# Altium PCB Copy before routing of BetaBake..PcbDoc (part 4 of 4)
Units mil, origin at the board's own origin, x right, y up, seen from the top; angles counter-clockwise.
Board outline 6000 x 4000 mil, 8 copper layers (Top Layer, GND Plein, Signal 2, PWR, GND Plein 2, Signal 3, GND Plein 3, Bottom Layer), stack 40.468 mil thick; 436 components, 343 nets, 1746 pads, 14 vias.
Unrouted connection lines stored in the file: 1158.
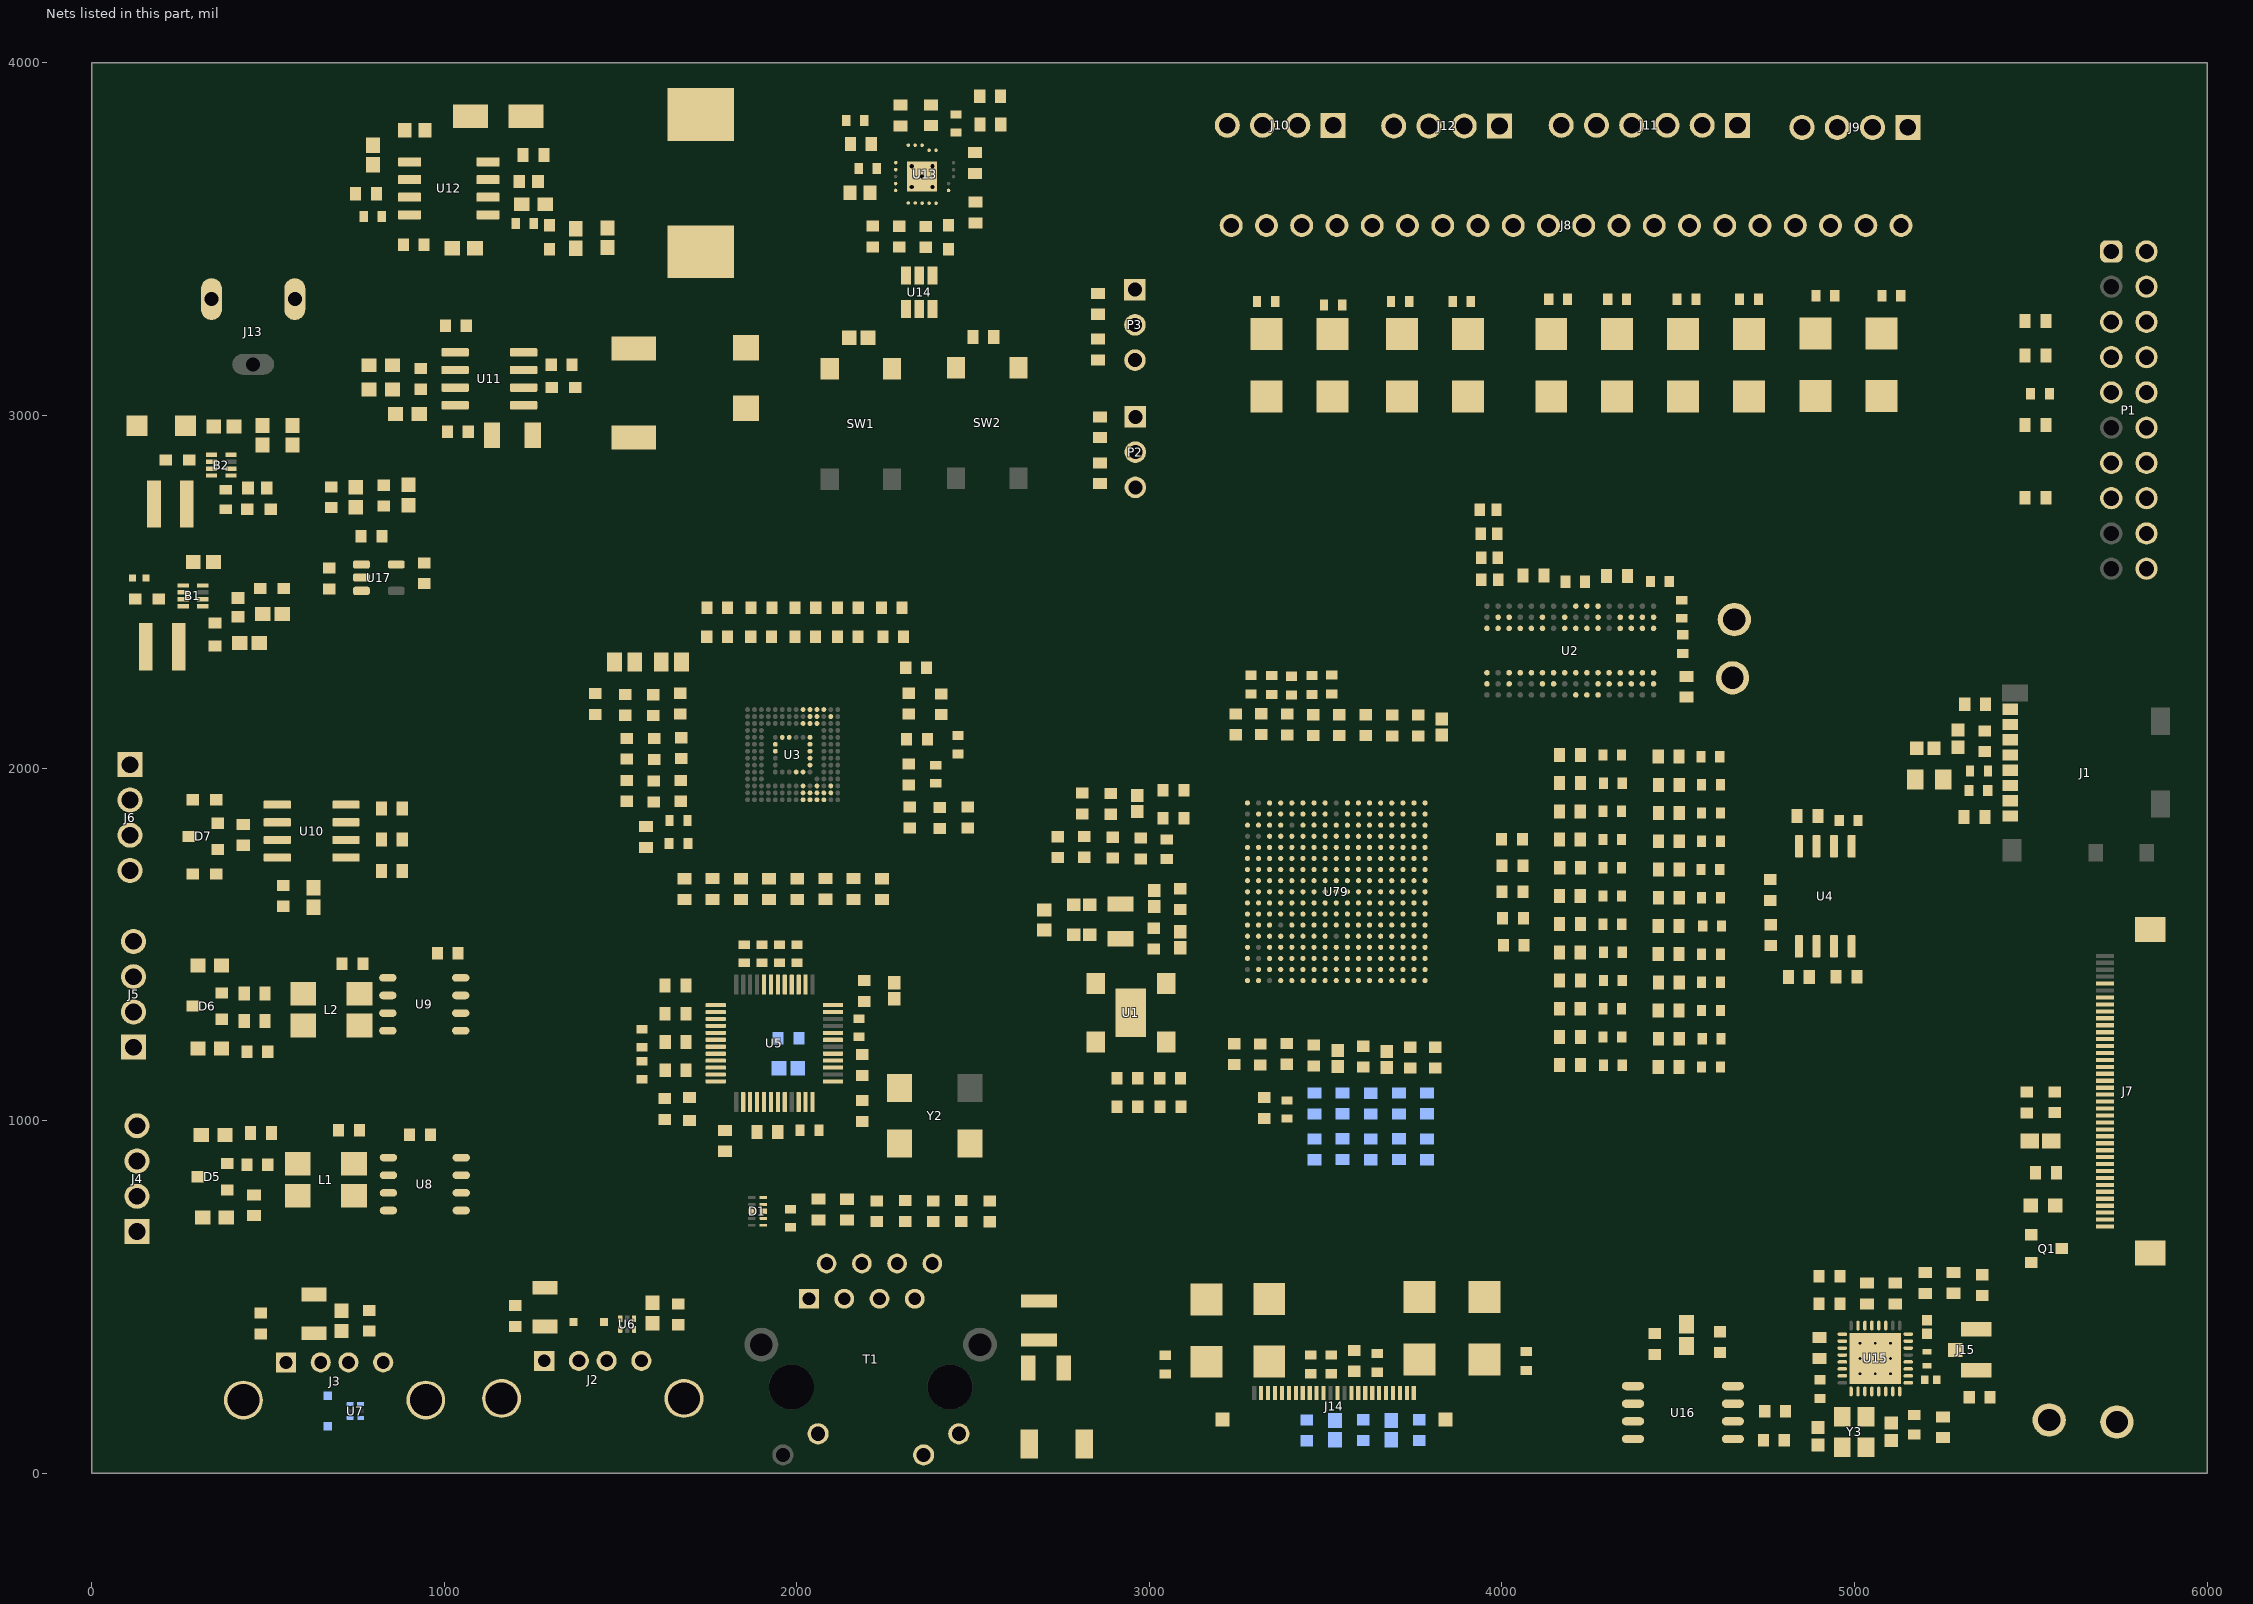
[diagram p5: the nets of this part, all layers, seen from the top]

## Part data (continued)
R143: library part CMP-2100-03664-2, "RES 10K OHM 1% 1/10W 0603", Case Code (Imperial)=0603, Case Code (Metric)=1608, Max Operating Temperature=155°C, Max Power Dissipation=100mW, Min Operating Temperature=-55°C, Resistance=10kR, Resistance Tolerance=1%, Resistor Type="Thick Film", Temperature Coefficient=100ppm/°C, Voltage Rating=75V, Voltage Rating (DC)=50V, Case/Package=0603, Construction=Rectangular, Depth=0.8mm, Features="Moisture Resistant", Height=0.45mm, Lead Free="Lead Free", Lead Pitch=0.3mm, Length=1.6mm, Military Standard=Not, Number of Pins=2, Number of Terminations=2, Packaging="Tape and Reel", Power Rating=100mW, RoHS Compliant=Yes, Series=RC, Size Code=0603, Termination=SMD/SMT, Tolerance=1%, Weight=7.1E-05oz, Width=0.8mm
R144: library part RC0603FR-07133KL, "133 kOhms Â±1% 0.1W, 1/10W Chip Resistor 0603 (1608 Metric) Moisture Resistant Thick Film", Package="1608 Yageo", Check_prices=https://www.snapeda.com/parts/RC0603FR-07133KL/Yageo/view-part/?ref=eda, MF=Yageo, MP=RC0603FR-07133KL, SnapEDA_Link=https://www.snapeda.com/parts/RC0603FR-07133KL/Yageo/view-part/?ref=snap
R145 R146 R153 R155: library part CMP-2100-03662-2, "RES SMD 100K OHM 1% 1/10W 0603", Case Code (Imperial)=0603, Case Code (Metric)=1608, Max Operating Temperature=155°C, Max Power Dissipation=100mW, Min Operating Temperature=-55°C, Resistance=100kR, Resistance Tolerance=1%, Resistor Type="Thick Film", Temperature Coefficient=100ppm/°C, Voltage Rating=50V, Working Voltage=75V, Case/Package=0603, Construction=Rectangular, Depth=0.8mm, Features="Moisture Resistant", Height=0.45mm, Lead Free="Lead Free", Length=1.6mm, Military Standard=Not, Number of Pins=2, Number of Terminations=2, Packaging="Tape and Reel", Power Rating=100mW, REACH SVHC="No SVHC", RoHS Compliant=Yes, Series=RC, Technology="THICK FILM", Termination=SMD/SMT, Tolerance=1%, Voltage Rating (DC)=50V, Width=0.8mm
R147 R159: library part CMP-2000-06925-2, "RES SMD 0 OHM JUMPER 1/10W 0603", Manufacturer=Yageo, Manufacturer Part Number=RC0603FR-070RL, Package=RC0603, Power Rating=0.1W, Temperature="-55°C to +155°C", Temperature Range High=+155°C, Temperature Range Low=-55°C, Tolerance=1%, Voltage Rating=75V, Automotive=No, Category=Res, ComponentLink2Description=Datasheet, ComponentLink2URL=http://www.yageo.com/documents/recent/PYu-RC_Group_51_RoHS_L_10.pdf, Composition="Thick Film", Device Class L1="Passive Components", Device Class L2=Resistors, Device Class L3="Chip SMD Resistors", Digikey Description="RES SMD 0 OHM JUMPER 1/10W 0603", Footprint Url=http://www.yageo.com/exep/pages/download/literatures/PYu-R_Mount_10.pdf, Height=0.55mm, Ipc Land Pattern Name=RESC16080X45, Lead Free=Yes, Mouser Description="RC Series 0603 0.1 W 0 O Jumper Surface Mount Thick Film Chip Resistor", Octopart=https://octopart.com/rc0603fr-070rl-yageo-1180803, Resistance=0Ω, RoHS=TRUE, Series=RC_L
R148: library part CMP-1659-00021-2, "Chip Resistor, 332 KOhm, +/- 1%, 0.1 W, -55 to 155 degC, 0603 (1608 Metric), RoHS, Tape and Reel", Case\Package=Metal, Colour=Silver, Package Quantity=300, Voltage Rating="40 V", ComponentLink1Description="Manufacturer URL", ComponentLink1URL=http://www.yageo.com/, ComponentLink2Description=Datasheet, ComponentLink2URL=http://www.yageo.com/documents/recent/PYu-RC_Group_51_RoHS_L_04.pdf, Connector Type=HDMI, Contact Material=Copper, Contact Plating=Gold, DatasheetVersion="Rev. 4, 02/2016", Gender=Female, Height="14.25 mm", Lead Pitch="0.5 mm", Length="15 mm", Mount="Surface Mount", PackageDescription="2-Pin Surface Mount Device, Body 1.6 x 0.8 mm", PackageReference=0603, Packaging="Tape and Reel", Pins=19, REACH SVHC="No SVHC", RoHSCompliant=true, Width="11.55 mm"
R149: library part CMP-2000-04894-1, Manufacturer=Yageo, Part Number=RC0603FR-07124KL
R150: library part CMP-2000-06926-1, "Chip Resistor, 10.2 KOhm, +/- 1%, 0.1 W, -55 to 155 degC, 0603 (1608 Metric), RoHS, Tape and Reel", Case Code - in=0603, Case Code - mm=1608, Manufacturer=Yageo, Operating Temperature Range=-55Cto+155C, Package / Case=0603(1608metric), Package Description="2-Pin Surface Mount Device, Body 1.6 x 0.8 mm", Power Rating=100mW, Resistance=10.2kOhms, Temperature Coefficient=100PPM/C, Tolerance=1%, Voltage Rating=75V, Brand=Yageo, Datasheet URL=http://www.yageo.com/documents/recent/PYu-RC_Group_51_RoHS_L_7.pdf, Datasheet Version="Rev. 7, 05/2017", Height=0.45mm, Length=1.6mm, Manufacturer URL=http://www.yageo.com/, Mounting Technology=SurfaceMount, Package Reference=0603, Packaging=Reel, Product=ThickFilmResistorsGeneralPurpose, Product Category=ThickFilmResistors, RoHS=True, Series=RC, Termination Style=SMD/SMT, Type=GeneralPurposeChipResistorSurfaceMount, Unit Weight=0.000071oz, Width=0.8mm
R151: library part CMP-2000-03299-2, "RES Thick Film, 3.24kΩ, 1%, 0.1W, 100ppm/°C, 0603", Case Code (Imperial)=0603, Case Code (Metric)=1608, Max Operating Temperature=155°C, Max Power Dissipation=100mW, Min Operating Temperature=-55°C, Package Quantity=10, Resistance=3.24kR, Temperature Coefficient=100ppm/°C, Tolerance=1%, Voltage Rating=75V, Case/Package=0603, Composition="Thick Film", Contact Plating=Tin, Depth=0.85mm, Features="Automotive AEC-Q200", Height=0.45mm, Length=1.55mm, Military Standard=Not, Mount="Surface Mount", Number of Pins=2, Number of Terminations=2, Packaging="Tape and Reel", Power Rating=100mW, Radiation Hardening=No, Termination=SMD/SMT, Weight=7.1E-05oz, Width=0.85mm, Working Voltage=75V
R152: library part CMP-2000-04112-1, Manufacturer=Yageo, Part Number=RC0603FR-0768K1L
R154: library part CMP-2000-03981-1, Manufacturer=Yageo, Part Number=RC0603FR-0729K4L
R160: library part CMP-2000-06944-1, "Chip Resistor, 68 KOhm, +/- 1%, 0.1 W, -55 to 155 degC, 0603 (1608 Metric), RoHS, Tape and Reel", Case Code - in=0603, Case Code - mm=1608, Manufacturer=Yageo, Operating Temperature Range=-55Cto+155C, Package Description="2-Pin Surface Mount Device, Body 1.6 x 0.8 mm", Power Rating=100mW, Resistance=68kOhms, Temperature Coefficient=100PPM/C, Tolerance=1%, Voltage Rating=50V, Datasheet URL=http://www.yageo.com/documents/recent/PYu-RC_Group_51_RoHS_L_7.pdf, Datasheet Version="Rev. 7, 05/2017", Manufacturer URL=http://www.yageo.com/, Mounting Technology=SurfaceMount, Package Reference=0603, Packaging=Reel, Product=ThickFilmResistorsGeneralPurpose, Series=RC, Termination Style=SMD/SMT
R161: library part CMP-2000-06938-1, "Chip Resistor, 33 KOhm, +/- 1%, 0.1 W, -55 to 155 degC, 0603 (1608 Metric), RoHS, Tape and Reel", Case Code - in=0603, Case Code - mm=1608, Manufacturer=Yageo, Operating Temperature Range=-55Cto+155C, Package Description="2-Pin Surface Mount Device, Body 1.6 x 0.8 mm", Power Rating=100mW, Resistance=33kOhms, Temperature Coefficient=100PPM/C, Tolerance=1%, Voltage Rating=50V, Datasheet URL=http://www.yageo.com/documents/recent/PYu-RC_Group_51_RoHS_L_7.pdf, Datasheet Version="Rev. 7, 05/2017", Manufacturer URL=http://www.yageo.com/, Mounting Technology=SurfaceMount, Package Reference=0603, Packaging=Reel, Product=ThickFilmResistorsGeneralPurpose, Series=RC, Termination Style=SMD/SMT
R162: library part CMP-2000-03962-1, Manufacturer=Yageo, Part Number=RC0603FR-0723K2L
R163: library part CMP-1012-00659-3, "Chip Resistor, 22 KOhm, +/- 1%, 0.1 W, -55 to 155 degC, 0603 (1608 Metric), RoHS, Tape and Reel", Case/Package=Radial, Current Rating="290 mA", Max Operating Temperature=105degC, Min Operating Temperature=-55degC, Package Quantity=100, Resistance="2.9 Ohm", Tolerance=10%, ComponentLink1Description="Manufacturer URL", ComponentLink1URL=http://www.yageo.com/, ComponentLink2Description=Datasheet, ComponentLink2URL=http://www.yageo.com/documents/recent/PYu-RC_Group_51_RoHS_L_04.pdf, DatasheetVersion="Rev. 4, 02/2016", Diameter="8.5 mm", Height="11 mm", Lead Pitch="5 mm", Mount="Through Hole", PackageDescription="2-Pin Surface Mount Device, Body 1.6 x 0.8 mm", PackageReference=0603, Packaging=Bulk, Pins=2, Radiation Hardening=No, REACH SVHC="No SVHC", RoHSCompliant=True, Shielding=Unshielded
R185: library part CMP-1659-00047-2, "Chip Resistor, 12 KOhm, +/- 1%, 100 mW, -55 to 155 degC, 0603 (1608 Metric), RoHS, Tape and Reel", Case Code (Imperial)=0603, Case Code (Metric)=1608, Max Operating Temperature="155 degC", Min Operating Temperature="-55 degC", Package Quantity=5000, Power Rating="100 mW", Resistance="12 kohm", Tolerance=1%, Voltage Rating="50 V", Case\Package=0603, ComponentLink1Description="Manufacturer URL", ComponentLink1URL=http://www.yageo.com/, ComponentLink2Description=Datasheet, ComponentLink2URL=http://www.yageo.com/documents/recent/PYu-RC_Group_51_RoHS_L_04.pdf, DatasheetVersion="Rev. 4, 02/2016", Height="0.45 mm", Length="1.6 mm", Mount="Surface Mount", PackageDescription="2-Pin Surface Mount Device, Body 1.6 x 0.8 mm", PackageReference=0603, Packaging="Tape and Reel", Pins=2, REACH SVHC="No SVHC", RoHSCompliant=true, Voltage Rating (DC)="50 V", Width="0.8 mm"
SW1 SW2: library part CMP-2000-05160-3, "Switch Tactile N.O SPST Round Button Gull Wing 0.05A 12VDC 100000Cycle 1.57N SMD T/R", Case/Package=SMD/SMT, Color=Black, Contact Current Rating=50mA, Contact Resistance=100mΩ, Insulation Resistance=100GΩ, Manufacturer Package Identifier=PTS645SM43SMTR92LFS, Max Operating Temperature=60°C, Max Voltage Rating (DC)=12V, Min Operating Temperature=-20°C, Operating Force=1.57N, Actuator Length=850µm, Actuator Material="Nylon, Polyamide", China RoHS=Compliant, ComponentLink1Description="Manufacturer's Website", ComponentLink1URL=http://www.ck-components.com/, ComponentLink2Description="Datasheet URL", ComponentLink2URL=https://www.ckswitches.com/media/1471/pts645.pdf, Contact Material=Silver, Contact Plating=Silver, Current Rating=50mA, Depth=9mm, Electrical Life=100kcycles, Height=3.45mm, HelpURL=https://www.ckswitches.com/media/1471/pts645.pdf, Illumination Type="Illuminated, Non-Illuminated", Lead Free="Lead Free", Length=6mm, Life (Cycles)=100kcycles, Lifecycle Status=Production, Max Current Rating=50mA, Mechanical Life=100kcycles, Mount="Surface Mount", Number of Positions=1, Orientation=Straight, Packaging="Cut Tape (CT)", REACH SVHC=Yes, RoHS=Compliant, Switch Function=Off-Mom, Termination=Solder, Throw Configuration=SPST, Voltage Rating (DC)=12V
T1: "RJ45 CONN, JACK, 8P8C, 1PORT, SMT ROHS COMPLIANT: YES", Package=None, Check_prices=https://www.snapeda.com/parts/7498010210A/W%25C3%25BCrth+Elektronik+Midcom/view-part/?ref=eda, MF="WÃ¼rth Elektronik", MP=7498010210A, SnapEDA_Link=https://www.snapeda.com/parts/7498010210A/W%25C3%25BCrth+Elektronik+Midcom/view-part/?ref=snap
U1: library part ASVMB-24.000MHZ-LY-T, "No Description Available", Manufacturer_Name=Abracon, Copyright="Copyright (C) 2026 Ultra Librarian. All rights reserved.", Manufacturer_Part_Number=ASVMB-24.000MHZ-LY-T, RefDes=RefDes, Type=Type
U2: library part CMP-2000-07475-2, "IC DRAM 4G PARALLEL 96FBGA", Manufacturer=Micron, Max Supply Voltage=1.45V, Min Supply Voltage=1.283V, Nominal Supply Current=12-156mA, Package=TW, Temperature="0°C to +85°C", Temperature Range High=+85°C, Temperature Range Low=0°C, Access Time=1.07ns, Automotive=No, Category=IC, ComponentLink2Description=Datasheet, ComponentLink2URL=https://www.micron.com/-/media/client/global/documents/products/data-sheet/dram/ddr3/4gb_ddr3l.pdf, Device Class L1="Integrated Circuits (ICs)", Device Class L2=Memory, Device Class L3=RAM, Digikey Description="IC DRAM 4G PARALLEL 96FBGA", Height=1.2mm, Interface=Parallel, Lead Free=Yes, Manufacturer Part Number=MT41K256M16TW-107:P, Memory Size=4Gbits, Memory Type=SDRAM,DDR3, Octopart=https://octopart.com/mt41k256m16tw-107%3Ap-micron-66533852, RoHS=TRUE, Standoff Height=0.29mm
U3: "4GB e.MMC Flash v5.1 Vcc 2.7 V - 3.6 V (13 x 11.5 x 0.8mm) I-Temp - FBGA-153", Package=None, Check_prices=https://www.snapeda.com/parts/S40FC004C1B1I00000/SkyHigh+Memory/view-part/?ref=eda, MF="SkyHigh Memory", MP=S40FC004C1B1I00000, SnapEDA_Link=https://www.snapeda.com/parts/S40FC004C1B1I00000/SkyHigh+Memory/view-part/?ref=snap
U4: "FLASH - NOR Memory IC 128Mb (16M x 8) SPI - Quad I/O, QPI, DTR 133 MHz 8-SOIC", Package="SOIC-8 Winbond Electronics", Check_prices=https://www.snapeda.com/parts/W25Q128JVSIQ/Winbond/view-part/?ref=eda, MF="Winbond Electronics", MP=W25Q128JVSIQ, SnapEDA_Link=https://www.snapeda.com/parts/W25Q128JVSIQ/Winbond/view-part/?ref=snap
U5: library part CMP-0058-00752-4, "PHYTER® Industrial Temperature Single Port 10/100 Mb/s Ethernet Physical Layer Transceiver, 48-pin LQFP, Pb-Free, 250 Tray", Manufacturer="Texas Instruments", PackageTopMarking=NSUZXYTT*DP83848VV*VBI, PowerWise=N, ComponentLink1Description="Datasheet URL", ComponentLink1URL=http://www.ti.com/general/docs/lit/getliterature.tsp?genericPartNumber=DP83848I&fileType=pdf, CompType="Interface IC", High-Reliability=Y, PackageDescription="LQFP, 7 x 7 x 1.4mm, 48 Lead, 0.5mm Pitch", PackageReference=PT0048A, PartNumber=DP83848IVV/NOPB, PinCount=48, RoHS=Y
U6 U7: library part CMP-0326-00025-3, "Low-Capacitance + / - 15 kV ESD-Protection Array for High-Speed Data Interfaces, 2 Channels, -40 to +85 degC, 6-pin SON (DRY), Green (RoHS & no Sb/Br)", Breakdown Voltage(Min)(V)=11, IO Capacitance(Typ)(pF)=1.5, IO Leakage Current(nA)=1, Manufacturer="Texas Instruments", ComponentLink1Description="Manufacturer URL", ComponentLink1URL=http://www.ti.com/, ComponentLink2Description=Datasheet, ComponentLink2URL=http://www.ti.com/general/docs/lit/getliterature.tsp?genericPartNumber=TPD2E001&fileType=pdf, ComponentLink3Description="URL Link1", ComponentLink3URL=SamplesURL:http://www.ti.com/product/tpd2e001#samples, DatasheetVersion=SLLS684F, Eco-Plan="Green (RoHS & no Sb/Br)", IEC 61000-4-2 Air-Gap(+/- kV)=15, IEC 61000-4-2 Contact(+/- kV)=8, Mounting Technology="Surface Mount", PackageDescription="6-Pin Plastic Small Outline No-Lead, 1 x 1.45 x 0.6 mm Body, 0.5 mm Pitch", PackageReference=DRY0006A, PackageVersion="revF, Dec-2011", PartNumber=TPD2E001DRYR, SubFamily="ESD Solution", USB High Speed=TRUE
U8 U9: library part CMP-2000-07245-1, "High-Speed CAN Transceiver, 3 to 5 V, 8-Pin SOIC (SOT96-1), RoHS, Tape and Reel", Manufacturer=NXP, Operating Supply Voltage (Max)=5.5V, Operating Supply Voltage (Min)=4.5V, Operating Supply Voltage (Typ)=5V, Operating Temperature (Max)=125C, Operating Temperature (Min)=-40C, Operating Temperature Classification=Automotive, Package Description="8-Pin Small Outline Integrated Circuit, Body 4.9 x 3.9 mm, Pitch 1.27 mm", Package Reference=SOT96-1, Package Type=SO, Power Down Mode=Normal/Silent, Supply Current=70mA, Category=Transceiver, Data Rate=1Mbps, Datasheet URL=http://www.nxp.com/documents/data_sheet/TJA1051.pdf, Datasheet Version="Rev. 7, 01/2015", DELETED=Compliant, Manufacturer URL=http://www.nxp.com/, Mounting=SurfaceMount, Mounting Technology=SurfaceMount, Number of Transceivers=1, Packaging=TapeandReel, Pin Count=8, Rad Hardened=No, Standard Supported=ISO11898-2
U10: "3.3V Powered, Â±15kV ESD-Protected, 12Mbps, Slew-Rate-Limited True RS-485/RS-422 Transceivers3.3V ä¾›ç”µã€Â±15kV ESD ä¿æŠ¤ã€12Mbpsã€åŽ‹æ‘†çŽ‡å—é™çš„çœŸæ­£ RS-485/RS-422 æ”¶å‘å™¨", Package="SOIC-8 Maxim", Check_prices=https://www.snapeda.com/parts/MAX3485EESA+T/Analog+Devices/view-part/?ref=eda, MF="Analog Devices", MP=MAX3485EESA+T, SnapEDA_Link=https://www.snapeda.com/parts/MAX3485EESA+T/Analog+Devices/view-part/?ref=snap
U11: "6.5V to 28V Input, 5V Fixed Output at 2A Step-Down Regulator with Intregrated MosFET", Package="SOIC-8 Texas Instruments", Check_prices=https://www.snapeda.com/parts/TPS5405DR/Texas+Instruments/view-part/?ref=eda, MF="Texas Instruments", MP=TPS5405DR, SnapEDA_Link=https://www.snapeda.com/parts/TPS5405DR/Texas+Instruments/view-part/?ref=snap
U12: library part CMP-0323-00209-3, "Buck Step Down Regulator with 3.5 to 28 V Input and 0.8 to 25 V Output, -40 to 150 degC, 8-Pin SOIC (D), Green (RoHS & no Sb/Br)", Manufacturer="Texas Instruments", Rating=Catalog, Switch Current Limit(Typ)(A)=3.5, Code_JEDEC=MS-012AA, ComponentLink1Description=Datasheet, ComponentLink1URL=http://www.ti.com/general/docs/lit/getliterature.tsp?genericPartNumber=TPS54331&fileType=pdf, ComponentLink2Description="Package Specification", ComponentLink2URL=http://www.ti.com/litv/pdf/msoi002j, ComponentLink3Description="URL Link1", ComponentLink3URL="Samples URL:http://www.ti.com/product/tps54331#samples", DatasheetVersion=SLVS839D, Duty Cycle(Max)(%)=90, Eco-Plan="Green (RoHS & no Sb/Br)", Iout(Max)(A)=3, Iq(Typ)(mA)=0.11, Mounting Technology="Surface Mount", PackageDescription="8-Pin Plastic Small Outline Integrated Circuit, 4.9 x 3.9 mm, Pitch 1.27 mm Pitch", PackageReference=D0008A, PackageVersion="revM, Jun-2011", PartNumber=TPS54331DR, Regulated Outputs(#)=1, SubFamily="Step-Down Regulator", Topology=Buck, Vin(Max)(V)=28, Vin(Min)(V)=3.5, Vout(Max)(V)=25, Vout(Min)(V)=0.8
U13: library part CMP-04919-000038-1, "IC SUPERVISOR 4 CHANNEL 20QFN", Case/Package=QFN, Max Operating Temperature=125°C, Max Output Current=1mA, Max Power Dissipation=2.86W, Max Reset Threshold Voltage=404mV, Max Supply Voltage=6.5V, Min Operating Temperature=-40°C, Min Reset Threshold Voltage=396mV, Min Supply Voltage=1.8V, Nominal Supply Current=13uA, Number of Voltages Monitored=4, Overvoltage Threshold=400mV, Package Quantity=1, Quiescent Current=12uA, Accuracy=0.25%, Height=0.95mm, Lead Free="Lead Free", Length=4.15mm, Mount="Surface Mount", Number of Pins=20, Operating Supply Current=13uA, Packaging="Tape and Reel", Power Dissipation=2.86W, Radiation Hardening=No, REACH SVHC="No SVHC", Reset="Active Low", RoHS Compliant=Yes, Termination=SMD/SMT, Threshold Voltage=400mV, Type="Multi-Voltage Supervisor", Watchdog Timer=Yes, Width=4.15mm
U14: library part CMP-0332-00499-1, "Low Quiescent Current, Programmable-Delay Supervisory Circuit, 1 Supply Monitored, -40 to 125 degC, 6-pin SOT-23 (DBV), Green (RoHS & no Sb/Br)", Manufacturer="Texas Instruments", PartNumber=TPS3808G33DBVTG4, Rating=Catalog, Threshold Voltage 1 (typ)(Typ)(V)=3.07, # of supplies monitored=1, Code_JEDEC=MO-178-AB*, ComponentLink1Description=Datasheet, ComponentLink1URL=http://www.ti.com/general/docs/lit/getliterature.tsp?genericPartNumber=TPS3808G33&fileType=pdf, DatasheetVersion=SBVS050J, Iq(Typ)(uA)=2.4, Mounting Technology="Surface Mount", Output Driver Type / Reset Output="Active-low, Open-drain", PackageDescription="6-Pin Plastic Small-Outline Package, 2.9 x 1.6 mm Body, 0.95 mm Pitch, 2.8 mm Lead Span", PackageReference=DBV6, PackageVersion="revK, Mar-2006", Reset Threshold Accuracy(%)=0.5, SubFamily="Supervisor and Reset IC", Time Delay(ms)=Programmable, VCC(Max)(V)=6.5, VCC(Min)(V)=1.7
U15: library part CMP-2000-07453-1, "Low-Power, Highly-Integrated Wi-Fi Solution, 2.5 to 3.6 V, 80 mA, -40 to 125 degC, 32-Pin QFN", Manufacturer="Espressif Systems", Package Description="32-Pin Quad Falt No-Lead, Body 5 x 5 mm, Pitch 0.5 mm", Package Reference=QFN-32, Datasheet URL=http://espressif.com/sites/default/files/documentation/0a-esp8266ex_datasheet_en.pdf, Datasheet Version="Rev. 5.4, 04/2017", Manufacturer URL=http://espressif.com, Mounting Technology=SurfaceMount
U16: library part W25Q32JVSSIQ, "FLASH - NOR Memory IC 32Mb (4M x 8) SPI - Quad I/O 133 MHz 8-SOIC", Package="SOIC-8 Winbond", Check_prices=https://www.snapeda.com/parts/W25Q32JVSSIQ/Winbond+Electronics/view-part/?ref=eda, MF=Winbond, MP=W25Q32JVSSIQ, SnapEDA_Link=https://www.snapeda.com/parts/W25Q32JVSSIQ/Winbond+Electronics/view-part/?ref=snap
U17: "300-mA, high-PSRR, low-IQ, low-dropout voltage regulator with enable", Package="SOT-23-5 Texas Instruments", Check_prices=https://www.snapeda.com/parts/TLV70218DBVT/Texas+Instruments/view-part/?ref=eda, MF="Texas Instruments", MP=TLV70218DBVT, SnapEDA_Link=https://www.snapeda.com/parts/TLV70218DBVT/Texas+Instruments/view-part/?ref=snap
Y1: library part ECS-.327-6-34RR-TR, "32.768kHz 20ppm Crystal 6pF 20 kOhm -40C ~ 85C Surface Mount 2-SMD, No Lead 3.2 x 1.5", Package="ECX-34RR-34RR-2 ECS", Check_prices=https://www.snapeda.com/parts/ECS-.327-6-34RR-TR/ECS/view-part/?ref=eda, MF="ECS Inc.", MP=ECS-.327-6-34RR-TR, SnapEDA_Link=https://www.snapeda.com/parts/ECS-.327-6-34RR-TR/ECS/view-part/?ref=snap
Y3: library part CMP-27762-015775-1, "Crystal 26MHz ±20ppm (Tol) ±30ppm (Stability) 18pF FUND 60Ω 4-Pin SMD T/R", Case/Package=CSMD, ESR (Equivalent Series Resistance)=60R, Frequency=26MHz, Frequency Stability=30ppm, Frequency Tolerance=20ppm, Load Capacitance=18pF, Max Operating Temperature=85°C, Min Operating Temperature=-40°C, Operating Frequency="26 MHz", Package Quantity=1000, Depth=2.5mm, Height=1mm, Lead Free="Lead Free", Length=3.2mm, Mount="Surface Mount", Packaging="Tape and Reel", Series=ABM8G, Termination=SMD/SMT, Tolerance=20ppm, Width=2.5mm

## Via types
v1: diameter 19.68, hole 7.87, Top Layer to Bottom Layer, 9 vias
v2: diameter 23.62, hole 11.81, Top Layer to Bottom Layer, 5 vias

## Nets (pads, with @x,y where several pads share a name; then routed paths per layer and width w, separated by ;. In a path a pad name is that pad's centre, name@x,y a point inside that pad or via, vN(x,y) a via of type N, cw(c..) or ccw(c..) an arc to the next point about the centre after c; other vN are vias at no path point)
A: D7.2 J6.1 R95.2 R100.1 U10.6
AGND: B1.4 B2.4 C151.1 C160.1 C161.2 J14.2 R145.1 R153.1 U5.15 U5.19
AVDD: C87.1 C90.2 C92.2 C93.2 C99.2 C151.2 C160.2 C161.1 C168.2 FB6.2 J14.4 R79.1 R80.1 R83.2 R84.2 R87.2 R88.2 T1.5 T1.6 U5.22 U15.1 U15.30
B: D7.1 J6.2 R95.1 R98.1 U10.7
"Chassis GND": C88.2 D2.2 R73.2 T1.10
CSI_DATA0: J14.24 U79.E4
CSI_DATA1: J14.23 U79.E3
CSI_DATA2: J14.22 U79.E2
CSI_DATA3: J14.21 U79.E1
CSI_DATA4: J14.20 U79.D4
CSI_DATA5: J14.19 U79.D3
CSI_DATA6: J14.18 U79.D2
CSI_DATA7: J14.16 U79.D1
DRAM_1V35: C7.1 C8.1 C9.1 C10.1 C11.1 C12.1 C13.1 C132.2 C133.2 C137.2 C148.2 C149.1 D21.2 L6.2 R149.2 R155.2 R163.1 R168.2 U79.G6 U79.H6 U79.J6 U79.K6 U79.L6 U79.M6
DRAM_ADDR0: U2.N3 U79.L5
DRAM_ADDR1: U2.P7 U79.H2
DRAM_ADDR2: U2.P3 U79.K1
DRAM_ADDR3: U2.N2 U79.M2
DRAM_ADDR4: U2.P8 U79.K4
DRAM_ADDR5: U2.P2 U79.L1
DRAM_ADDR6: U2.R8 U79.G2
DRAM_ADDR7: U2.R2 U79.H4
DRAM_ADDR8: U2.T8 U79.J4
DRAM_ADDR9: U2.R3 U79.L2
DRAM_ADDR10: U2.L7 U79.M4
DRAM_ADDR11: U2.R7 U79.K3
DRAM_ADDR12: U2.N7 U79.L4
DRAM_ADDR13: U2.T3 U79.H3
DRAM_ADDR14: U2.T7 U79.G1
DRAM_ADDR15: U2.J1 U79.K5
DRAM_DATA0: U2.E3 U79.T4
DRAM_DATA1: U2.F7 U79.U6
DRAM_DATA2: U2.F2 U79.T6
DRAM_DATA3: U2.F8 U79.U7
DRAM_DATA4: U2.H3 U79.U8
DRAM_DATA5: U2.H8 U79.T8
DRAM_DATA6: U2.G2 U79.T5
DRAM_DATA7: U2.H7 U79.U4
DRAM_DATA8: U2.D7 U79.U2
DRAM_DATA9: U2.C3 U79.U3
DRAM_DATA10: U2.C8 U79.U5
DRAM_DATA11: U2.C2 U79.R4
DRAM_DATA12: U2.A7 U79.P5
DRAM_DATA13: U2.A2 U79.P3
DRAM_DATA14: U2.B8 U79.R2
DRAM_DATA15: U2.A3 U79.R1
DRAM_SDQ0_N: C46.2 C47.2 U2.G3 U79.P7
DRAM_SDQ0_P: C46.1 C47.1 U2.F3 U79.P6
DRAM_SDQS1_N: C48.2 C49.2 U2.B7 U79.T2
DRAM_SDQS1_P: C48.1 C49.1 U2.C7 U79.T1
DRAM_VREF: C45.1 C148.1 C150.2 R168.1 R169.2 U79.P4
EMMC_DATA0: R62.2 U3.A3 U79.D7
EMMC_DATA1: R61.2 U3.A4 U79.B7
EMMC_DATA2: R60.2 U3.A5 U79.A7
EMMC_DATA3: R59.2 U3.B2 U79.D6
EMMC_DATA4: R58.2 U3.B3 U79.C6
EMMC_DATA5: R57.2 U3.B4 U79.B6
EMMC_DATA6: R56.2 U3.B5 U79.A6
EMMC_DATA7: R55.2 U3.B6 U79.A5
GND: C1.2 C2.2 C3.2 C4.2 C5.2 C6.2 C7.2 C8.2 C9.2 C10.2 C11.2 C12.2 C13.2 C14.2 C15.2 C16.2 C17.2 C18.2 C19.2 C20.2 C21.2 C22.2 C23.2 C24.2 C25.2 C26.2 C27.2 C28.2 C29.2 C30.1 C31.1 C32.2 C33.2 C34.2 C35.2 C36.1 C37.2 C38.2 C39.2 C40.2 C41.2 C42.2 C43.2 C44.1 C45.2 C50.1 C51.1 C52.1 C53.2 C54.2 C55.2 C56.2 C57.2 C58.2 C59.2 C60.2 C81.2 C82.2 C83.2 C87.2 C88.1 C90.1 C91.1 C92.1 C93.1 C94.2 C95.2 C96.2 C97.2 C98.1 C99.1 C100.1 C101.2 C102.1 C103.2 C104.1 C105.2 C106.1 C107.2 C108.1 C109.1 C110.2 C111.1 C112.2 C113.1 C114.1 C115.1 C116.2 C117.1 C120.2 C121.1 C124.1 C128.1 C130.1 C131.1 C134.2 C135.2 C136.2 C139.2 C140.2 C142.2 C144.2 C145.1 C146.2 C147.1 C149.2 C150.1 C152.1 C153.1 C154.1 C155.1 C159.1 C162.1 C163.1 C164.1 C165.1 C166.1 C167.1 C168.1 C169.1 C170.1 C245.2 C356.1 D1.3 D1.8 D2.1 D3.1 D4.1 D5.3 D6.3 D7.3 D8.1 D9.1 D10.1 D11.1 D12.1 D13.1 D14.1 D15.1 D16.1 D17.1 D18.2 D20.2 D22.1 D23.1 D24.1 D25.1 GND.1 J1.6 J2.4 J2.5 J2.6 J3.4 J3.5 J3.6 J4.3 J4.4 J5.3 J5.4 J6.3 J6.4 J7.3 J7.29 J7.36 J7.41 J7.42 J8.4 J8.10 J8.14 J8.18 J8.19 J8.20 J9.4 J10.4 J11.6 J12.4 J13.2 J14.15 J14.MP1 J14.MP2 J15.G1 J15.G2 P1.4 P1.6 P1.8 P1.10 P1.12 P1.14 P1.16 P1.18 P1.20 Q1.2 R6.1 R7.1 R8.1 R9.1 R10.1 R11.1 R12.1 R13.1 R14.1 R15.1 R16.1 R17.1 R18.1 R19.1 R20.1 R21.1 R22.1 R23.1 R24.1 R25.1 R26.1 R27.1 R28.1 R29.1 R30.1 R31.1 R32.1 R33.1 R34.1 R35.1 R36.1 R37.1 R38.1 R39.1 R40.2 R43.2 R44.2 R45.1 R46.1 R65.1 R73.1 R76.2 R78.1 R81.1 R86.2 R96.1 R98.2 R135.2 R142.2 R151.2 R152.1 R154.1 R164.1 R165.1 R166.1 R167.1 R169.1 R171.1 R173.1 R184.2 R185.2 SW1.3 SW2.3 U1.2 U1.5 U3.A6 U3.C4 U3.E7 U3.G5 U3.H10 U3.J5 U3.K8 U3.N2 U3.N5 U3.P4 U3.P6 U4.4 U5.35 U5.36 U5.47 U6.4 U7.4 U8.2 U8.8 U9.2 U9.8 U10.5 U11.7 U12.7 U13.6 U13.11 U13.12 U13.21 U14.2 U15.33 U16.4 U17.2 U79.A1 U79.A17 U79.C3 U79.C7 U79.C11 U79.C15 U79.E8 U79.E11 U79.F6 U79.F7 U79.F8 U79.F9 U79.F10 U79.F11 U79.F12 U79.G3 U79.G5 U79.G7 U79.G12 U79.G15 U79.H7 U79.H12 U79.J5 U79.J7 U79.J12 U79.K7 U79.K12 U79.L3 U79.L7 U79.L12 U79.M7 U79.M8 U79.M9 U79.M10 U79.M11 U79.M12 U79.N3 U79.N5 U79.N7 U79.R3 U79.R5 U79.R7 U79.R11 U79.R16 U79.R17 U79.T14 U79.U1 U79.U14 U79.U17 Y2.2 Y3.2 Y3.4
  other v1: 5015.69,282 5059,282 5102.31,282 5015.69,325.31 5059,325.31 5102.31,325.31 5015.69,368.61 5059,368.61 5102.31,368.61
  other v2: 2325.94,3648 2385,3648 2355.47,3677.53 2325.94,3707.06 2385,3707.06
I2C1_SCL: D13.2 J8.12 J12.2 R2.1 U79.F17
I2C1_SDA: D12.2 J8.13 J12.3 R1.1 U79.G13
I2C2_SCL: D9.2 J8.16 J10.2 R3.1 R174.2 U79.G17
I2C2_SDA: D8.2 J8.17 J10.3 J14.3 R4.1 U79.G16
LED_ACT/COL: T1.2 U5.26
LED_LINK: T1.11 U5.28
LED_SPEED: R71.1 U5.27
MODE_RS485: R96.2 U10.2 U10.3
NetB1_3: B1.3 D19.1 R146.1
NetB1_5: B1.5 L3.1
NetB1_6: B1.6 C125.1 R144.1 R145.2
NetB2_3: B2.3 D21.1 R155.1
NetB2_5: B2.5 L6.1
NetB2_6: B2.6 C137.1 R149.1 R153.2
NetC18_1: C18.1 C19.1 C20.1 C21.1 U79.G8 U79.H8 U79.J8 U79.J11 U79.K8 U79.K11 U79.L8 U79.L9 U79.L10 U79.L11
NetC24_1: C24.1 C25.1 C26.1 U79.G9 U79.G10 U79.G11 U79.H11
NetC36_2: C36.2 U79.N12
NetC44_2: C44.2 SW1.1 U79.R8
NetC51_2: C51.2 R51.1 U79.A2
NetC52_2: C52.2 J1.5 R51.2
NetC53_1: C53.1 R53.2 U3.K5 U79.B4
NetC60_1: C60.1 U3.C2
NetC61_1: C61.1 C62.1 C63.2 C64.2 C65.2 C66.2 C67.2 C68.2 C69.2 C70.1
NetC71_1: C71.1 C72.1 C73.2 C74.2 C75.2 C76.2 C77.2 C78.2 C79.2 C80.1
NetC104_2: C104.2 D5.1 J4.1 L1.2 R91.2
NetC105_1: C105.1 R91.1 R92.2
NetC107_1: C107.1 D5.2 J4.2 L1.3 R92.1
NetC109_2: C109.2 D6.1 J5.1 L2.2 R93.2
NetC110_1: C110.1 R93.1 R94.2
NetC112_1: C112.1 D6.2 J5.2 L2.3 R94.1
NetC117_2: C117.2 FB4.1 J7.4
NetC120_1: C120.1 R143.1
NetC121_2: C121.2 U11.4
NetC126_1: C126.1 U11.1
NetC126_2: C126.2 D18.1 L4.1 U11.8
NetC129_1: C129.1 U12.1
NetC129_2: C129.2 D20.1 L5.1 U12.8
NetC139_1: C139.1 U12.4
NetC140_1: C140.1 C141.2 U12.6
NetC141_1: C141.1 R154.2
NetC145_2: C145.2 U14.4
NetC146_1: C146.1 R158.1 SW2.1 U14.3
NetC147_2: C147.2 U14.5 U14.6
NetC163_2: C163.2 J15.1 L7.2
NetD3_2: D3.2 F1.1 J2.1 R89.1 U6.1
NetD4_2: D4.2 F2.1 J3.1 R90.1 U7.1
NetD22_2: D22.2 J14.17 R178.1
NetD23_2: D23.2 J14.13 R177.1
NetD24_2: D24.2 J14.9 R176.1
NetD25_2: D25.2 J14.7 R175.1
NetJ1_1: J1.1 U79.B3
NetJ1_2: J1.2 U79.B2
NetJ1_3: J1.3 R50.2
NetJ1_8: J1.8 U79.C1
NetJ2_2: J2.2 U6.6 U79.T15
NetJ2_3: J2.3 U6.3 U79.U15
NetJ3_2: J3.2 U7.6 U79.T13
NetJ3_3: J3.3 U7.3 U79.U13
NetJ7_1: J7.1 Q1.3
NetJ7_2: J7.2 R104.2
NetJ7_5: J7.5 R114.2
NetJ7_6: J7.6 R115.2
NetJ7_7: J7.7 R116.2
NetJ7_8: J7.8 R117.2
NetJ7_9: J7.9 R118.2
NetJ7_10: J7.10 R110.2
NetJ7_11: J7.11 R111.2
NetJ7_12: J7.12 R119.2
NetJ7_13: J7.13 R120.2
NetJ7_14: J7.14 R122.2
NetJ7_15: J7.15 R125.2
NetJ7_16: J7.16 R112.2
NetJ7_17: J7.17 R127.2
NetJ7_18: J7.18 R128.2
NetJ7_19: J7.19 R113.2
NetJ7_20: J7.20 R129.2
NetJ7_21: J7.21 R102.2
NetJ7_22: J7.22 R103.2
NetJ7_23: J7.23 R105.2
NetJ7_24: J7.24 R106.2
NetJ7_25: J7.25 R107.2
NetJ7_26: J7.26 R108.2
NetJ7_27: J7.27 R109.2
NetJ7_28: J7.28 R130.2
NetJ7_30: J7.30 R121.2
NetJ7_31: J7.31 R200.2
NetJ7_32: J7.32 R123.2
NetJ7_33: J7.33 R124.2
NetJ7_34: J7.34 R126.2
NetJ14_5: J14.5 R174.1
NetJ14_6: J14.6 U79.M17
NetJ14_8: J14.8 U79.M16
NetL1_1: L1.1 U8.7
NetL1_4: L1.4 U8.6
NetL2_1: L2.1 U9.7
NetL2_4: L2.4 U9.6
NetP1_5: P1.5 R132.2 U79.N16
NetP1_7: P1.7 R131.2 U79.P14
NetP1_9: P1.9 R134.2
NetP1_13: P1.13 U79.N15
NetP1_15: P1.15 R133.2 U79.N14
NetP2_1: P2.1 R170.2
NetP2_2: P2.2 U79.T10
NetP2_3: P2.3 R171.2
NetP3_1: P3.1 R172.2
NetP3_2: P3.2 U79.U10
NetP3_3: P3.3 R173.2
NetQ1_1: Q1.1 R101.2
NetR5_2: R5.2 R118.1 U79.C10
NetR6_2: R6.2 R114.1 U79.B9
NetR7_2: R7.2 U79.P15
NetR8_2: R8.2 R115.1 U79.A9
NetR9_2: R9.2 R116.1 U79.E10
NetR10_2: R10.2 R117.1 U79.D10
NetR11_2: R11.2 R110.1 U79.B10
NetR12_2: R12.2 R111.1 U79.A10
NetR13_2: R13.2 R119.1 U79.D11
NetR14_2: R14.2 R120.1 U79.B11
NetR15_2: R15.2 R122.1 U79.A11
NetR16_2: R16.2 R125.1 U79.E12
NetR17_2: R17.2 R112.1 U79.D12
NetR18_2: R18.2 R127.1 U79.C12
NetR19_2: R19.2 R128.1 U79.B12
NetR20_2: R20.2 R113.1 U79.A12
NetR21_2: R21.2 R129.1 U79.D13
NetR22_2: R22.2 R102.1 U79.C13
NetR23_2: R23.2 R103.1 U79.B13
NetR24_2: R24.2 R105.1 U79.A13
NetR25_2: R25.2 R106.1 U79.D14
NetR26_2: R26.2 R107.1 U79.C14
NetR27_2: R27.2 R108.1 U79.B14
NetR28_2: R28.2 R109.1 U79.A14
NetR29_2: R29.2 R130.1 U79.B16
NetR30_2: R30.2 U79.N8
NetR31_2: R31.2 U79.N9
NetR32_2: R32.2 U79.N10
NetR33_2: R33.2 U79.N11
NetR34_2: R34.2 U79.P9
NetR35_2: R35.2 U79.P10
NetR36_2: R36.2 U79.P11
NetR37_2: R37.2 U79.R6
NetR38_2: R38.2 U79.R9
NetR39_2: R39.2 U79.R10
NetR40_1: R40.1 U79.N4
NetR41_2: R41.2 U2.K7
NetR42_2: R42.2 U2.J7
NetR43_1: R43.1 U2.L8
NetR44_1: R44.1 U2.K9 U79.M3
NetR45_2: R45.2 U2.T2 U79.G4
NetR46_2: R46.2 U2.L9 U79.J3
NetR54_1: R54.1 R64.1 U79.C8
NetR63_1: R63.1 U79.D8
NetR63_2: R63.2 U3.M6
NetR64_2: R64.2 U3.M5
NetR65_2: R65.2 U3.H5
NetR66_2: R66.2 U4.1 U79.E6
NetR67_2: R67.2 U4.7 U79.A4
NetR68_2: R68.2 U4.3 U79.B5
NetR69_1: R69.1 U79.D5
NetR69_2: R69.2 U4.6
NetR70_2: R70.2 Y2.3
NetR72_1: R72.1 T1.1
NetR74_1: R74.1 T1.12
NetR75_1: R75.1 U5.7 U79.N17
NetR76_1: R76.1 U5.8
NetR77_1: R77.1 U5.29 U79.M15
NetR78_2: R78.2 U5.5
NetR81_2: R81.2 U5.6
NetR82_1: R82.1 U5.30 U79.K17
NetR85_2: R85.2 U5.39
NetR86_1: R86.1 U5.24
NetR87_1: R87.1 U5.20
NetR88_1: R88.1 U5.21
NetR101_1: R101.1 U79.L17
NetR121_1: R121.1 U79.A8
NetR123_1: R123.1 U79.D9
NetR124_1: R124.1 U79.C9
NetR126_1: R126.1 U79.B8
NetR134_1: R134.1 R135.1 U79.M14
NetR136_1: R136.1 U79.J16
NetR137_1: R137.1 U79.J17
NetR138_1: R138.1 U79.D17
NetR139_1: R139.1 U79.C17
NetR140_1: R140.1 U79.B15
NetR141_1: R141.1 U79.A16
NetR142_1: R142.1 U11.3
NetR143_2: R143.2 U11.6
NetR147_1: R147.1 R150.2
NetR148_1: R148.1 R152.2 U12.3
NetR150_1: R150.1 R151.1 U12.5
NetR156_1: R156.1 U13.1
NetR157_1: R157.1 R159.2 U13.15 U13.16 U13.17 U13.18 U13.19
NetR159_1: R159.1 U14.1 U79.P8
NetR160_2: R160.2 R164.2 U13.10
NetR161_2: R161.2 R165.2 U13.9
NetR162_2: R162.2 R166.2 U13.8
NetR163_2: R163.2 R167.2 U13.7
NetR175_2: R175.2 U79.F2
NetR176_2: R176.2 U79.F3
NetR177_2: R177.2 U79.F5
NetR178_2: R178.2 U79.E5
NetR179_2: R179.2 U15.15
NetR180_2: R180.2 U15.14
NetR181_1: R181.1 U15.32 U79.L15
NetR182_1: R182.1 U15.8
NetR183_1: R183.1 U15.7
NetR184_1: R184.1 U15.13 U79.K15
NetR185_1: R185.1 U15.31
NetR186_2: R186.2 U16.6
NetR200_1: R200.1 U79.K13
NetU2_D3: U2.D3 U79.T3
NetU2_E7: U2.E7 U79.T7
NetU2_J3: U2.J3 U79.M5
NetU2_J9: U2.J9 U79.H5
NetU2_K1: U2.K1 U79.N1
NetU2_K3: U2.K3 U79.J2
NetU2_L1: U2.L1 U79.F1
NetU2_L2: U2.L2 U79.N2
NetU2_L3: U2.L3 U79.J1
NetU2_M2: U2.M2 U79.M1
NetU2_M3: U2.M3 U79.K2
NetU2_N8: U2.N8 U79.H1
NetU4_2: U4.2 U79.C5
NetU4_5: U4.5 U79.A3
NetU5_2: U5.2 U79.F15
NetU5_3: U5.3 U79.E15
NetU5_4: U5.4 U79.E14
NetU5_31: U5.31 U79.L16
NetU5_40: U5.40 U79.E16
NetU5_41: U5.41 U79.D15
NetU5_43: U5.43 U79.F16
NetU5_44: U5.44 U79.E17
NetU8_1: U8.1 U79.H15
NetU8_4: U8.4 U79.G14
NetU9_1: U9.1 U79.J15
NetU9_4: U9.4 U79.H14
NetU13_20: U13.20 U79.L14
NetU15_6: U15.6 WIFI_TOUT.1
NetU15_12: U15.12 U79.J14
NetU15_25: U15.25 U79.K14
NetU15_26: U15.26 U79.K16
NVCC_CSI: B1.1 B1.2 B2.1 B2.2 C1.1 C2.1 C3.1 C6.1 C15.1 C16.1 C17.1 C22.1 C23.1 C27.1 C30.2 C31.2 C37.1 C38.1 C39.1 C50.2 C81.1 C82.1 C83.1 C91.2 C98.2 C106.2 C111.2 C114.2 C115.2 C116.1 C127.2 C130.2 C131.2 C138.2 C144.1 C152.2 C154.2 C159.2 C164.2 C167.2 C169.2 C170.2 C245.1 C356.2 FB1.1 FB4.2 FB6.1 J1.4 J8.1 J8.5 J8.11 J8.15 J9.1 J10.1 J11.1 J12.1 J14.10 L5.2 P1.1 P1.2 R1.2 R2.2 R3.2 R4.2 R5.1 R48.2 R49.2 R52.1 R66.1 R67.1 R68.1 R71.2 R72.2 R74.2 R75.2 R77.2 R82.2 R85.1 R97.1 R99.1 R100.2 R104.1 R131.1 R132.1 R133.1 R147.2 R156.2 R157.2 R158.2 R160.1 R170.1 R172.1 R179.1 R180.1 R181.2 R182.2 R183.2 U1.1 U1.4 U4.8 U5.32 U5.48 U8.5 U9.5 U10.8 U13.14 U15.3 U15.4 U15.11 U15.17 U15.29 U16.8 U17.1 U17.3 U79.C4 U79.E7 U79.E13 U79.F4 U79.F13 U79.H13 U79.J13 U79.L13 U79.M13 U79.N13 U79.P12 Y2.4
NVCC_PLL: C4.1 C5.1 C142.1 C153.2 C155.2 FB2.1 J14.11 R161.1 U17.5 U79.P13
PFBIN1: C94.1 C95.1 C96.1 C97.1 U5.18 U5.23 U5.37
PGND: B1.8 B2.8 C122.1 C123.1 C127.1 C132.1 C133.1 C138.1
RD_N: D1.5 R83.1 T1.8 U5.13
RD_P: D1.4 R79.2 T1.7 U5.14
RTC_XTALI: C29.1 U79.U11 Y1.1
RTC_XTALO: C28.1 U79.T11 Y1.2
RX_RS485: R99.2 U10.1 U79.H16
SD1_CMD: R48.1 R49.1 R50.1 U79.B1
SD1_DATA0: J1.7 R52.2 U79.C2
SDCLK0_N: R41.1 R47.1 SDCLK0_N.1 U79.P2
SDCLK0_P: R42.1 R47.2 SDCLK0_P.1 U79.P1
SPI_CS0: D15.2 J8.8 J11.4 R140.2
SPI_MISO: D17.2 J8.6 J11.2 R138.2
SPI_MOSI: D16.2 J8.7 J11.3 R139.2
SPI_SCLK: D14.2 J8.9 J11.5 R141.2
TD_N: D1.2 R84.1 T1.4 U5.16
TD_P: D1.1 R80.2 T1.3 U5.17
TX_RS485: R97.2 U10.4 U79.H17
UART_RX: D11.2 J8.2 J9.2 R136.2
UART_TX: D10.2 J8.3 J9.3 R137.2
VCC_3V3: C54.1 C55.1 C56.1 C61.2 C62.2 C63.1 C64.1 C65.1 C66.1 C67.1 C68.1 C69.1 C70.2 FB1.2 U3.E6 U3.F5 U3.J10 U3.K9
VCCQ_1V8: C57.1 C58.1 C59.1 C71.2 C72.2 C73.1 C74.1 C75.1 C76.1 C77.1 C78.1 C79.1 C80.2 FB2.2 R53.1 R54.2 R55.1 R56.1 R57.1 R58.1 R59.1 R60.1 R61.1 R62.1 U3.C6 U3.M4 U3.N4 U3.P3 U3.P5
VDD_HIGH_CAP: C14.1 C42.1 C43.1 U79.N6 U79.R14 U79.R15
VDD_OTG1_VBUS: C101.1 R89.2 U79.T12
VDD_OTG2_VBUS: C103.1 R90.2 U79.U12
VDD_SOC_IN: C32.1 C33.1 C34.1 C35.1 C122.2 C123.2 C125.2 D19.2 L3.2 R144.2 R146.2 R162.1 U79.H9 U79.H10 U79.J9 U79.J10 U79.K9 U79.K10
VDD_USB_CAP: C40.1 C41.1 U79.R12
Vin: C124.2 C134.1 C135.1 C136.1 J13.1 R148.2 U11.2 U12.2
Vout: C100.2 C102.2 C108.2 C113.2 C128.2 F1.2 F2.2 L4.2 U8.3 U9.3 U11.5
WF_CLK: R186.1 U15.21
WF_CS: U15.20 U16.1
WF_RF_ANT: C162.2 L7.1 U15.2
WF_SDIO_DATA0: U15.22 U16.5
WF_SDIO_DATA1: U15.23 U16.2
WF_SDIO_DATA2: U15.18 U16.3
WF_SDIO_DATA3: U15.19 U16.7
WF_XTALI: C165.2 U15.28 Y3.1
WF_XTALO: C166.2 U15.27 Y3.3
X1: R70.1 U5.34
XTALI: U1.3 U79.T16
pads on no net: B1.7 B2.7 D1.6 D1.7 D1.9 D1.10 J1.9 J1.10 J1.11 J1.12 J1.13 J1.14 J7.35 J7.37 J7.38 J7.39 J7.40 J13.3 J14.1 J14.12 J14.14 P1.3 P1.11 P1.17 P1.19 SW1.2 SW1.4 SW2.2 SW2.4 T1. T1.9 T1.S1 T1.S2 U2.A1 U2.A8 U2.A9 U2.B1 U2.B2 U2.B3 U2.B9 U2.C1 U2.C9 U2.D1 U2.D2 U2.D8 U2.D9 U2.E1 U2.E2 U2.E8 U2.E9 U2.F1 U2.F9 U2.G1 U2.G7 U2.G8 U2.G9 U2.H1 U2.H2 U2.H9 U2.J2 U2.J8 U2.K2 U2.K8 U2.M1 U2.M7 U2.M8 U2.M9 U2.N1 U2.N9 U2.P1 U2.P9 U2.R1 U2.R9 U2.T1 U2.T9 U3.A1 U3.A2 U3.A7 U3.A8 U3.A9 U3.A10 U3.A11 U3.A12 U3.A13 U3.A14 U3.B1 U3.B7 U3.B8 U3.B9 U3.B10 U3.B11 U3.B12 U3.B13 U3.B14 U3.C1 U3.C3 U3.C5 U3.C7 U3.C8 U3.C9 U3.C10 U3.C11 U3.C12 U3.C13 U3.C14 U3.D1 U3.D2 U3.D3 U3.D4 U3.D12 U3.D13 U3.D14 U3.E1 U3.E2 U3.E3 U3.E5 U3.E8 U3.E9 U3.E10 U3.E12 U3.E13 U3.E14 U3.F1 U3.F2 U3.F3 U3.F10 U3.F12 U3.F13 U3.F14 U3.G1 U3.G2 U3.G3 U3.G10 U3.G12 U3.G13 U3.G14 U3.H1 U3.H2 U3.H3 U3.H12 U3.H13 U3.H14 U3.J1 U3.J2 U3.J3 U3.J12 U3.J13 U3.J14 U3.K1 U3.K2 U3.K3 U3.K6 U3.K7 U3.K10 U3.K12 U3.K13 U3.K14 U3.L1 U3.L2 U3.L3 U3.L12 U3.L13 U3.L14 U3.M1 U3.M2 U3.M3 U3.M7 U3.M8 U3.M9 U3.M10 U3.M11 U3.M12 U3.M13 U3.M14 U3.N1 U3.N3 U3.N6 U3.N7 U3.N8 U3.N9 U3.N10 U3.N11 U3.N12 U3.N13 U3.N14 U3.P1 U3.P2 U3.P7 U3.P8 U3.P9 U3.P10 U3.P11 U3.P12 U3.P13 U3.P14 U5.1 U5.9 U5.10 U5.11 U5.12 U5.25 U5.33 U5.38 U5.42 U5.45 U5.46 U6.2 U6.5 U7.2 U7.5 U13.2 U13.3 U13.4 U13.5 U13.13 U15.5 U15.9 U15.10 U15.16 U15.24 U17.4 U79.A15 U79.B17 U79.C16 U79.D16 U79.E9 U79.F14 U79.P16 U79.P17 U79.R13 U79.T9 U79.T17 U79.U9 U79.U16 Y2.1
copper on no net: | length 0.6
  Top Layer w4.6: 3309.55,1900.94 3310,1901.39

## Polygon pours and split planes (outlines as drawn)
NVCC_CSI on GND Plein (split plane): 5979.9,20.1 20.1,20.1 20.1,3979.9 5979.9,3979.9
NVCC_CSI on GND Plein 3 (split plane): 5979.9,20.1 20.1,20.1 20.1,3979.9 5979.9,3979.9

## Text inside footprints (layer, text, board x,y; h text height)
J1: Top Overlay "SD CARD" at 5989,2202 h50 r270; Top 3D Body "*" at 5417,1986 h50 r270
T1: Top 3D Body "1" at 2009.14,470.15 h32.06 r180; Top 3D Body "9" at 1909.11,94.54 h32.04 r180; Top 3D Body "10" at 2009.27,144.62 h32.04 r180; Top 3D Body "12" at 2409.63,144.68 h32.02 r180; Top 3D Body "11" at 2309.51,94.74 h32 r180; Top 3D Body "LEFT" at 2009.12,-143.5 h24.05 r180; Top 3D Body "RIGHT" at 2497.35,-143.22 h24.03 r180; Top 3D Body "4" at 2159.43,570.25 h32.05 r180; Top 3D Body "6" at 2259.56,570.13 h32.04 r180; Top 3D Body "7" at 2309.69,470.16 h32.06 r180; Top 3D Body "2" at 2059.39,569.98 h32.02 r180; Top 3D Body "8" at 2359.8,570.38 h32.06 r180; Top 3D Body "3" at 2109.4,469.96 h32.03 r180; Top 3D Body "5" at 2209.5,469.95 h32.03 r180; Top 3D Body "FRONT" at 2272.09,-18.13 h32.05 r180